# Altium PCB Karta_TETRA.PCBDOC (part 2 of 8)
Units mm, origin at the board's own origin, x right, y up, seen from the top; angles counter-clockwise.
Board outline 70 x 83.2 mm, 6 copper layers (TopLayer, Layer 1, Layer 2, Layer 3, Layer 4, Bottom Layer), stack 0.914 mm thick; 344 components, 222 nets, 1133 pads, 615 vias.
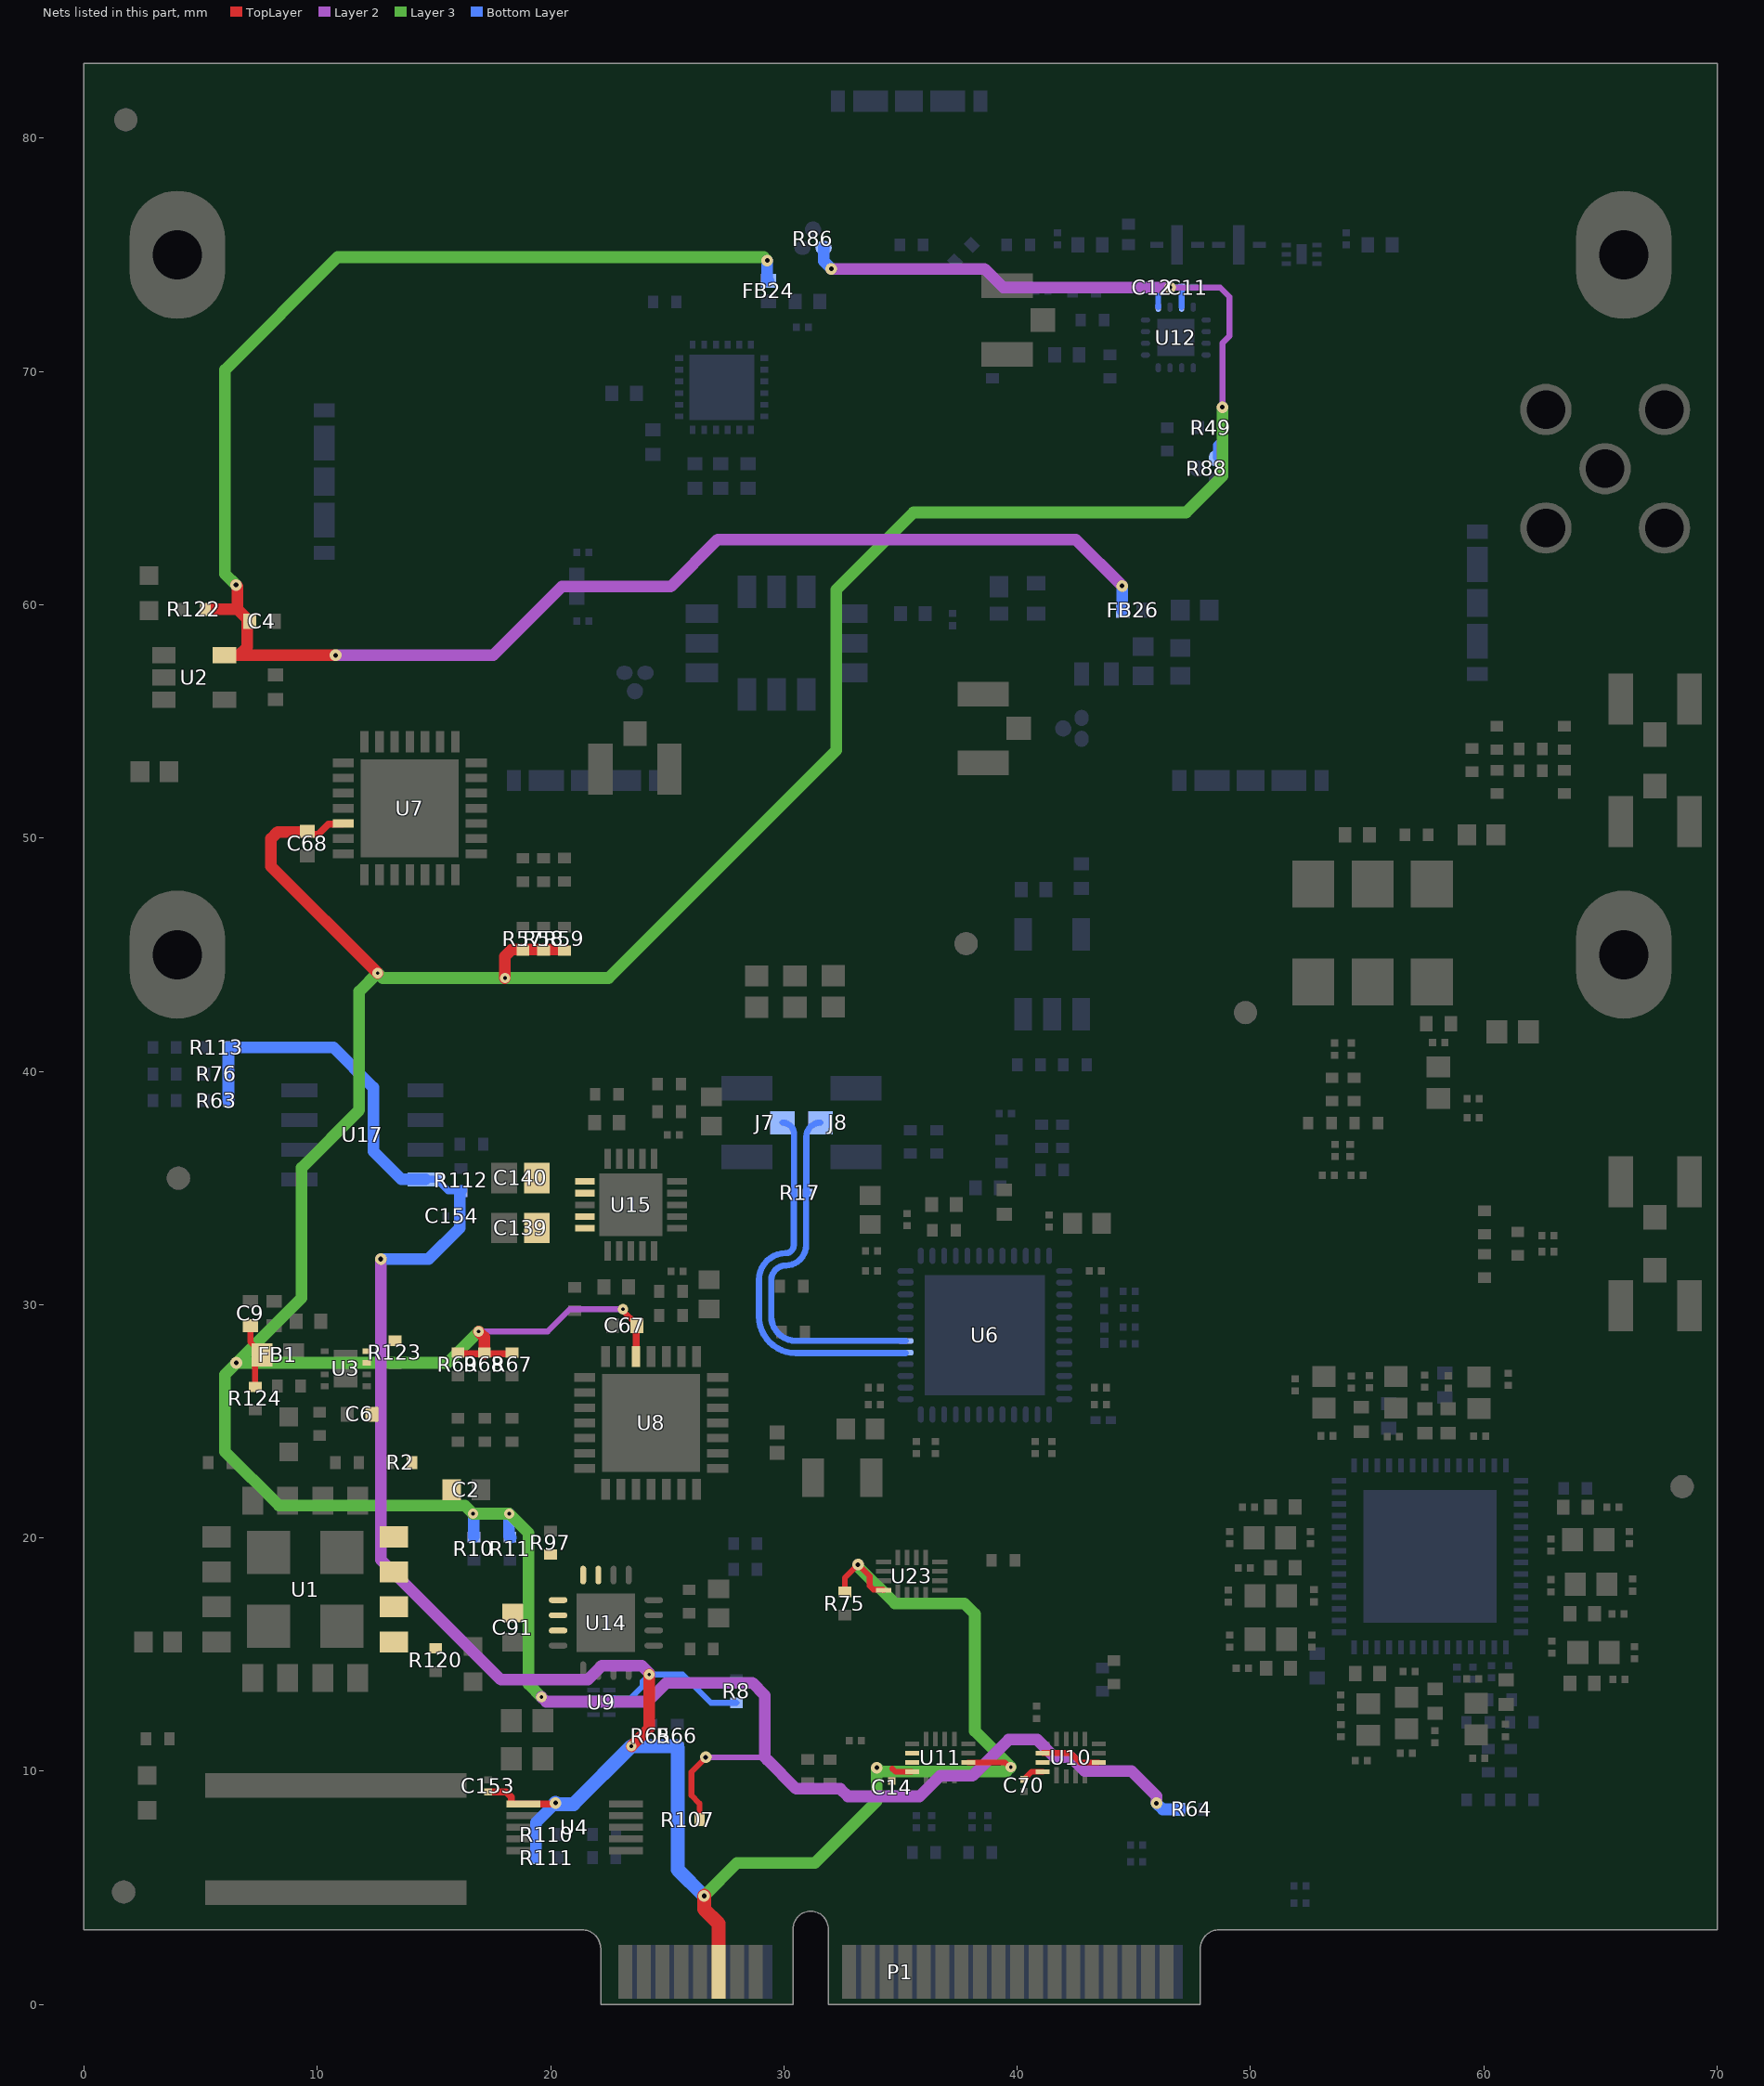
[diagram p6: the nets of this part, all layers, seen from the top]

## Footprints (in the part's own frame and the unit in brackets; to place one, negate y for a bottom-side part, rotate by r counter-clockwise, add the part's x,y. Pads: shape width x height; smd on the part's side, far side on the other; paste and mask are expansions set on the pad) (continued)
"RES 0201/0603"#2 [mm] "Chip Resistor, 2-Leads, Body 0.60x0.30mm, IPC Medium Density"
  rect 0.44x0.35 smd: 1(-0.325,0) 2(0.394,0)
  silkscreen extent -0.7,-0.33 0.7,0.33, body extent -0.3,-0.15 0.3,0.15, height 0.21
"RES 0201/0603"#3 [mm] "Chip Resistor, 2-Leads, Body 0.60x0.30mm, IPC Medium Density"
  rect 0.44x0.35 smd mask+0.055: 1(-0.325,0) 2(0.325,0)
  silkscreen extent -0.7,-0.33 0.7,0.33, body extent -0.3,-0.15 0.3,0.15, height 0.21
"RES 0402/1005 RF - 3-PADS" [mm] "Chip Resistor, 2-Leads, Body 1.0x0.5mm, IPC High Density"
  oval 0.7x0.6 smd: 1(-0.45,0) 2(0.45,0)
  round 0.7 smd paste-2: 3(0,0.787)
  silkscreen extent -1.02,-0.5 1.02,1.34, body extent -0.5,-0.25 0.5,0.25, height 0.35
"RES 0402/1005 RF KK" [mm] "Chip Resistor, 2-Leads, Body 1.0x0.5mm, IPC High Density"
  rect 0.45x0.55 smd: 1(-0.5,0) 2(0.5,0)
  silkscreen extent -1.02,-0.51 1.02,0.51, body extent -0.5,-0.25 0.5,0.25, height 0.35
"RES 0603/1608 RF" [mm]
  rect 0.75x0.85 smd: 1(-0.6,0) 2(0.6,0)
  silkscreen extent -1.2,-0.6 1.2,0.6, body extent -0.8,-0.4 0.8,0.4, height 0.45
ROS-32K101-400L5_V [mm] "SMA Straight Jack, 6.35x6.35x9.5mm, Rosenberger Recommended"
  round 2.2 hole 1.65: 1(0,0) MH(-2.54,2.54) MH(-2.54,-2.54) MH(2.54,2.54) MH(2.54,-2.54)
  silkscreen extent -3.17,-3.18 3.18,3.17, body extent -3.17,-3.17 3.18,3.18, height 9.5
Tai-Saw_7x5p12 [mm] "TA0409A, 12-Pins, Body 5,00x7,00mmx1,70mm, Pitch 1,27mm, IPC Medium Density"
  rect 1.4x0.8 smd: 1(-2.2,1.27) 2(-2.2,0) 3(-2.2,-1.27) 7(2.2,-1.27) 8(2.2,0) 9(2.2,1.27)
  rect 0.8x1.4 smd: 4(-1.27,-3.2) 5(0,-3.2) 6(1.27,-3.2) 10(1.27,3.2) 11(0,3.2) 12(-1.27,3.2)
  silkscreen extent -3.57,-3.6 2.6,3.6, body extent -2.5,-3.5 2.5,3.5, height 1.7
TECO-1909763-1_V [mm] "SMD, 3-Leads, Body 2.6x2.6mm, Height 1.25mm"
  rect 1.05x2.2 smd: 1(-1.475,0) 3(1.475,0)
  rect 1x1.05 smd: 2(0,-1.525)
  silkscreen extent -1.9,-1.77 0.55,1.3, body extent -1.5,-1.55 1.5,1.55, height 1.25
TPS7A88 [mm] "RTJ (S-PWQFN-N20) 20-Leads, Body 4,00x4,00mm, Pitch 0,50mm, Thermal Pad 2,70x2,70mm, IPC High Density"
  rect 0.85x0.28 smd: 1(-1.975,1) 2(-1.975,0.5) 3(-1.975,0) 4(-1.975,-0.5) 5(-1.975,-1) 11(1.975,-1) 12(1.975,-0.5) 13(1.975,0) 14(1.975,0.5) 15(1.975,1)
  rect 0.28x0.85 smd: 6(-1,-1.975) 7(-0.5,-1.975) 8(0,-1.975) 9(0.5,-1.975) 10(1,-1.975) 16(1,1.975) 17(0.5,1.975) 18(0,1.975) 19(-0.5,1.975) 20(-1,1.975)
  rect 2.7x2.7 smd paste-3 mask+0.102: 21(0,0)
  silkscreen extent -2.85,-2.07 2.07,2.07, body extent -2.07,-2.07 2.07,2.07, height 0.8
TXB0304 [mm] "RSV0016A UQFN - 0.55 mm max height"
  rect 0.75x0.2 smd: 1(-0.75,0.6)
  rect 0.65x0.2 smd: 2(-0.8,0.2) 3(-0.8,-0.2) 4(-0.8,-0.6) 9(0.8,-0.6) 10(0.8,-0.2) 11(0.8,0.2) 12(0.8,0.6)
  rect 0.2x0.65 smd: 5(-0.6,-1.2) 6(-0.2,-1.2) 7(0.2,-1.2) 8(0.6,-1.2) 13(0.6,1.2) 14(0.2,1.2) 15(-0.2,1.2) 16(-0.6,1.2)
  silkscreen extent -1.27,1.58 -1.18,1.67, body extent -0.92,-1.33 0.92,1.33, height 0.55
VG-4513CA [mm] "VG-4513CA, Concave, 6-Leads, Pitch 2,54mm,  Body 7,00x5,00mm,  IPC Medium Density"
  rect 2x1.8 smd: 1(-2.1,2.54) 2(-2.1,0) 3(-2.1,-2.54) 4(2.1,-2.54) 5(2.1,0) 6(2.1,2.54)
  silkscreen extent -3.26,3.28 -3.16,3.38, body extent -2.55,-3.5 2.55,3.5, height 1.6
WE-KI_0603 [mm] "SMD Wire Wound Ceramic Inductor, body 1.6x1.05mm"
  rect 0.625x1 smd: 1(-0.637,0) 2(0.637,0)
  body extent -0.82,-0.58 0.83,0.58, height 0.92

## Part data
C1 C2 C38 C75 C76 C91: library part Capacitor, "TAIYO YUDEN - EMK107ABJ475MA-T - SMD Multilayer Ceramic Capacitor, 4.7 µF, 16 V, 0603 [1608 Metric], ± 20%, X5R, M Series", Case/Package=Ceramic, Dielectric=X5R, Manufacturer="Taiyo Yuden", Manufacturer Part Number=EMK107ABJ475MA-T, Max Operating Temperature=85°C, Min Operating Temperature=-55°C, Supplier Part Number 1=587-6003-1-ND, Tolerance=20%, Voltage=16V, Capacitance=4.7uF, Category="Ceramic Capacitors", ComponentLink1Description=https://datasheet.ciiva.com/26871/getdatasheetpartid-637315-26871304.pdf?src-supplier=Verical, ComponentLink1URL=https://datasheet.ciiva.com/26871/getdatasheetpartid-637315-26871304.pdf?src-supplier=Verical, Depth=0.8mm, Height=0.8mm, Lead Free="Lead Free", Length=1.6mm, Mount="Surface Mount", Packaging="Tape and Reel", Pricing 1="1=0,28000, 10=0,19200, 50=0,12820, 100=0,10900, 500=0,07696, 1000=0,06734 (USD)", Radiation Hardening=No, RoHS=Yes, Stock 1=5, Supplier 1=Digi-Key
C3: library part Capacitor, Case Code (Imperial)=0603, Case Code (Metric)=1608, Dielectric=X5R, Manufacturer 1=Samsung, Manufacturer Part Number 1=CL10A105KA8NNNC, Max Operating Temperature=85°C, Min Operating Temperature=-55°C, Package Quantity=1, Supplier Part Number 1=1276-1102-1-ND, Tolerance=10%, Voltage=25V, Capacitance=1uF, Case/Package=0603, ComponentLink1Description=https://datasheet.ciiva.com/25801/cl10a105ka8nnnc-25801364.pdf?src-supplier=Digi-Key, ComponentLink1URL=https://datasheet.ciiva.com/25801/cl10a105ka8nnnc-25801364.pdf?src-supplier=Digi-Key, ComponentLink2Description=https://datasheet.ciiva.com/26838/getdatasheetpartid-357530-26838332.pdf?src-supplier=Verical, ComponentLink2URL=https://datasheet.ciiva.com/26838/getdatasheetpartid-357530-26838332.pdf?src-supplier=Verical, ComponentLink3Description=https://datasheet.ciiva.com/29198/458162-da-01-en-vs-kondensator-0603-29198475.pdf?src-supplier=Conrad, ComponentLink3URL=https://datasheet.ciiva.com/29198/458162-da-01-en-vs-kondensator-0603-29198475.pdf?src-supplier=Conrad, Contact Plating=Tin, Depth=0.8mm, Height=0.8mm, Lead Free="Lead Free", Length=1.6mm, Material=Ceramic, Mount="Surface Mount", Packaging="Tape and Reel", Pricing 1="1=0.10000, 10=0.04100, 100=0.01850, 500=0.01320, 1000=0.01037 (USD)", Radiation Hardening=No, RoHS=Yes, Stock 1=3421596, Supplier 1=Digi-Key, Thickness=0.035inch, Voltage Rating=25V, Voltage Rating (DC)=25V, Width=0.031inch
C4 C65 C73 C74: library part Capacitor, "MURATA - GRM155R61A225KE95D - Keramikvielschichtkondensator, SMD, 2.2 µF, 10 V, 0402 [Metrisch 1005], ± 10%, X5R, Baureihe GRM", Case Code (Imperial)=0402, Case Code (Metric)=1005, Dielectric=X5R, Manufacturer=Murata, Manufacturer Part Number=GRM155R61A225KE95D, Max Operating Temperature=85°C, Min Operating Temperature=-55°C, Package Quantity=10000, Supplier Part Number 1=490-10451-1-ND, Tolerance=10%, Voltage Rating=10V, Capacitance=2.2uF, Case/Package=0402, Category="Ceramic Capacitors", ComponentLink1Description=http://www.mouser.com/ds/2/281/c02e-2905.pdf?src-supplier=Mouser, ComponentLink1URL=http://www.mouser.com/ds/2/281/c02e-2905.pdf?src-supplier=Mouser, ComponentLink2Description=http://components.arrow.com/part/dataview/0323_04264073?src-supplier=Arrow+Europe, ComponentLink2URL=http://components.arrow.com/part/dataview/0323_04264073?src-supplier=Arrow+Europe, ComponentLink3Description=http://www.farnell.com/datasheets/1872202.pdf?src-supplier=Farnell, ComponentLink3URL=http://www.farnell.com/datasheets/1872202.pdf?src-supplier=Farnell, ComponentLink4Description=http://www.farnell.com/datasheets/2047915.pdf?src-supplier=Farnell, ComponentLink4URL=http://www.farnell.com/datasheets/2047915.pdf?src-supplier=Farnell, ComponentLink5Description=http://www.farnell.com/datasheets/1872202.pdf?src-supplier=Element14, ComponentLink5URL=http://www.farnell.com/datasheets/1872202.pdf?src-supplier=Element14, ComponentLink6Description=http://www.farnell.com/datasheets/1872202.pdf?src-supplier=Newark, ComponentLink6URL=http://www.farnell.com/datasheets/1872202.pdf?src-supplier=Newark, ComponentLink7Description=http://psearch.en.murata.com/capacitor/product/GRM155R61A225KE95%23.pdf?src-supplier=Avnet, ComponentLink7URL=http://psearch.en.murata.com/capacitor/product/GRM155R61A225KE95%23.pdf?src-supplier=Avnet, ComponentLink8Description=http://www.farnell.com/datasheets/2047915.pdf?src-supplier=Element14, ComponentLink8URL=http://www.farnell.com/datasheets/2047915.pdf?src-supplier=Element14, ComponentLink9Description=https://search.murata.co.jp/Ceramy/image/img/A01X/G101/ENG/GRM155R61A225KE95-01.pdf?src-supplier=Digi-Key, ComponentLink9URL=https://search.murata.co.jp/Ceramy/image/img/A01X/G101/ENG/GRM155R61A225KE95-01.pdf?src-supplier=Digi-Key, ComponentLink10Description=http://www.farnell.com/datasheets/2047915.pdf?src-supplier=Newark, ComponentLink10URL=http://www.farnell.com/datasheets/2047915.pdf?src-supplier=Newark, Depth=0.5mm, Height=0.5mm, Lead Free="Lead Free", Length=1mm, Material=Ceramic, Mount="Surface Mount", Packaging="Tape and Reel", REACH SVHC="No SVHC", RoHS=Yes, Supplier 1=Digi-Key, Termination=SMD/SMT, Thickness=0.022inch, Voltage Rating (DC)=10V, Weight=0.000212oz, Width=0.5mm
  C4: Pricing 1="1=0,11000, 10=0,07700, 50=0,04380, 100=0,03630, 500=0,02546, 1000=0,02108, 2500=0,01962, 5000=0,01795 (USD)", Stock 1=502318
  C65 C73 C74: Pricing 1="1=0,11000, 10=0,08100, 100=0,03800, 500=0,02664, 1000=0,02205, 2500=0,02052, 5000=0,01878 (USD)", Stock 1=2215146
C5 C42: library part Capacitor, Case Code (Imperial)=0402, Case Code (Metric)=1005, Dielectric=C0G, Dielectric Material=Ceramic, Manufacturer 1=KEMET, Manufacturer Part Number 1=C0402C101J5GACAUTO, Max Operating Temperature=125°C, Min Operating Temperature=-55°C, Package Quantity=10000, Ratings=AEC-Q200, Supplier Part Number 1=399-6823-1-ND, Tolerance=5%, Voltage Rating=50V, Capacitance=100pF, Case/Package=0402, ComponentLink1Description=https://datasheet.ciiva.com/26923/getdatasheetpartid-385375-26923866.pdf?src-supplier=Verical, ComponentLink1URL=https://datasheet.ciiva.com/26923/getdatasheetpartid-385375-26923866.pdf?src-supplier=Verical, Depth=0.5mm, Lead Free="Lead Free", Length=1mm, Mount="Surface Mount", Packaging="Tape and Reel", Pricing 1="1=0.11000, 10=0.08400, 100=0.03730, 500=0.02664, 1000=0.02093, 2500=0.01903, 5000=0.01751 (USD)", Radiation Hardening=No, REACH SVHC="No SVHC", RoHS=Yes, Stock 1=66452, Supplier 1=Digi-Key, Thickness=0.022inch, Voltage Rating (DC)=50V, Width=0.02inch
C6 C7 C67 C68: library part Capacitor, "MURATA - GRT155R61E105KE01D - SMD Multilayer Ceramic Capacitor, 1 µF, 25 V, 0402 [1005 Metric], ± 10%, X5R, GRT Series - SMD Multilayer Ceramic Capacitor, 1 µF, 25 V, 0402 [1005 Metric], ± 10%, X5R, GRT Series", Case Code (Imperial)=0402, Case Code (Metric)=1005, Dielectric=X5R, Manufacturer=Murata, Manufacturer Part Number=GRT155R61E105KE01D, Max Operating Temperature=85°C, Min Operating Temperature=-55°C, Ratings=AEC-Q200, Supplier Part Number 1=490-12263-1-ND, Tolerance=10%, Voltage Rating=25V, Capacitance=1uF, Case/Package=0402, Category="Ceramic Capacitors", ComponentLink1Description=http://www.farnell.com/datasheets/2165918.pdf?src-supplier=Farnell, ComponentLink1URL=http://www.farnell.com/datasheets/2165918.pdf?src-supplier=Farnell, ComponentLink2Description=http://search.murata.co.jp/Ceramy/image/img/A01X/G101/ENG/GRT155R61E105KE01-01.pdf?src-supplier=Digi-Key, ComponentLink2URL=http://search.murata.co.jp/Ceramy/image/img/A01X/G101/ENG/GRT155R61E105KE01-01.pdf?src-supplier=Digi-Key, ComponentLink3Description=http://www.farnell.com/datasheets/2165918.pdf?src-supplier=Element14, ComponentLink3URL=http://www.farnell.com/datasheets/2165918.pdf?src-supplier=Element14, Length=0.039inch, Mount="Surface Mount", Packaging="Tape and Reel", Pricing 1="1=0,18000, 10=0,12300, 100=0,06210, 500=0,04248, 1000=0,03758, 2500=0,03594, 5000=0,03268 (USD)", RoHS=Yes, Stock 1=341453, Supplier 1=Digi-Key, Thickness=0.022inch, Voltage Rating (DC)=25V, Width=0.02inch
C8 C9: library part Capacitor, Case Code (Imperial)=0402, Case Code (Metric)=1005, Manufacturer 1=Murata, Manufacturer Part Number 1=GRM155R61A475MEAAD, Max Operating Temperature=85°C, Min Operating Temperature=-55°C, Supplier Part Number 1=490-14306-1-ND, Tolerance=20%, Voltage Rating=10V, Capacitance=4.7uF, Case/Package=0402, ComponentLink1Description=http://www.farnell.com/datasheets/2189109.pdf?src-supplier=Farnell, ComponentLink1URL=http://www.farnell.com/datasheets/2189109.pdf?src-supplier=Farnell, ComponentLink2Description=https://search.murata.co.jp/Ceramy/image/img/A01X/G101/ENG/GRM155R61A475MEAA-01.pdf?src-supplier=Digi-Key, ComponentLink2URL=https://search.murata.co.jp/Ceramy/image/img/A01X/G101/ENG/GRM155R61A475MEAA-01.pdf?src-supplier=Digi-Key, ComponentLink3Description=http://datasheet.octopart.com/GRM155R61A475MEAAD-Murata-datasheet-68589269.pdf?src-supplier=Newark, ComponentLink3URL=http://datasheet.octopart.com/GRM155R61A475MEAAD-Murata-datasheet-68589269.pdf?src-supplier=Newark, ComponentLink4Description=http://datasheet.octopart.com/GRM155R61A475MEAAD-Murata-datasheet-8819587.pdf, ComponentLink4URL=http://datasheet.octopart.com/GRM155R61A475MEAAD-Murata-datasheet-8819587.pdf, ComponentLink5Description=http://datasheet.octopart.com/GRM155R61A475MEAAD-Murata-datasheet-10025737.pdf, ComponentLink5URL=http://datasheet.octopart.com/GRM155R61A475MEAAD-Murata-datasheet-10025737.pdf, ComponentLink6Description=http://datasheet.octopart.com/GRM155R61A475MEAAD-Murata-datasheet-11978611.pdf, ComponentLink6URL=http://datasheet.octopart.com/GRM155R61A475MEAAD-Murata-datasheet-11978611.pdf, ComponentLink7Description=http://datasheet.octopart.com/GRM155R61A475MEAAD-Murata-datasheet-12510076.pdf, ComponentLink7URL=http://datasheet.octopart.com/GRM155R61A475MEAAD-Murata-datasheet-12510076.pdf, ComponentLink8Description=http://datasheet.octopart.com/GRM155R61A475MEAAD-Murata-datasheet-12515295.pdf, ComponentLink8URL=http://datasheet.octopart.com/GRM155R61A475MEAAD-Murata-datasheet-12515295.pdf, Mount="Surface Mount", Packaging="Tape and Reel", Pricing 1="1=0.23000, 10=0.15400, 100=0.07780, 500=0.05322, 1000=0.04708, 2500=0.04504, 5000=0.04094 (USD)", Stock 1=1535315, Supplier 1=Digi-Key
C10 C158 C159 C160 C163 C164 C167 C169: library part Capacitor, "CAP CER 120PF 25V C0G/NP0 0402", Case Code (Imperial)=0402, Case Code (Metric)=1005, Manufacturer=KEMET, Manufacturer Part Number=C0402C121J3GAC7867, Max Operating Temperature=125°C, Min Operating Temperature=-55°C, Supplier Part Number 1=399-14880-1-ND, Tolerance=5%, Voltage Rating=25V, Capacitance=120pF, Case/Package=0402, Category="Ceramic Capacitors", ComponentLink1Description=https://api.kemet.com/component-edge/download/datasheet/C0402C121J3GAC7867.pdf?src-supplier=Digi-Key, ComponentLink1URL=https://api.kemet.com/component-edge/download/datasheet/C0402C121J3GAC7867.pdf?src-supplier=Digi-Key, Mount="Surface Mount", Packaging="Tape and Reel", Pricing 1="1=0,10000, 10=0,04100, 50=0,02260, 100=0,01840, 500=0,01312, 1000=0,01032, 2500=0,00938, 5000=0,00863 (USD)", RoHS=No, Stock 1=43311, Supplier 1=Digi-Key
C11 C48 C49 C168 C186 C187: library part Capacitor, "Multilayer Ceramic Capacitors MLCC - SMD/SMT 0201 100pF 25volts C0G +/-5%", Case Code (Imperial)=0201, Case Code (Metric)=0603, Dielectric=C0G, Manufacturer=Murata, Manufacturer Part Number=GRM0335C1E101JA01D, Max Operating Temperature=125°C, Min Operating Temperature=-55°C, Package Quantity=15000, Supplier Part Number 1=490-3160-1-ND, Tolerance=5%, Voltage=25V, Capacitance=100pF, Case/Package=0201, Category="Ceramic Capacitors", ComponentLink1Description=https://datasheet.ciiva.com/16497/grm0335c1e101ja01-01-16497112.pdf?src-supplier=Future+Electronics, ComponentLink1URL=https://datasheet.ciiva.com/16497/grm0335c1e101ja01-01-16497112.pdf?src-supplier=Future+Electronics, ComponentLink2Description=https://datasheet.ciiva.com/18697/product-18697797.pdf?src-supplier=Digi-Key, ComponentLink2URL=https://datasheet.ciiva.com/18697/product-18697797.pdf?src-supplier=Digi-Key, Depth=0.3mm, Height=0.3mm, Lead Free="Lead Free", Length=0.6mm, Mount="Surface Mount", Packaging="Tape and Reel", Radiation Hardening=No, REACH SVHC="No SVHC", RoHS=Yes, Supplier 1=Digi-Key, Termination=SMD/SMT, Thickness=0.013inch, Voltage Rating=25V, Voltage Rating (DC)=25V, Width=0.012inch
  C11 C186 C187: Pricing 1="1=0,10000, 10=0,01300, 100=0,00560, 500=0,00400, 1000=0,00315, 2500=0,00286, 5000=0,00263 (USD)", Stock 1=270262
  C48 C49 C168: Pricing 1="1=0,10000, 10=0,01200, 50=0,00660, 100=0,00530, 500=0,00382, 1000=0,00299, 2500=0,00272, 5000=0,00250 (USD)", Stock 1=2569728
C12 C13 C14 C15 C40 C41 C43 C44 C46 C47 C50 C51 C52 C53 C54 C55 C56 C57 C58 C59 C66 C70 C71 C77 C78 C79 C80 C81 C82 C83 C84 C85 C88 C89 C90 C93 C94 C95 C97 C98 C99 C101 C102 C103 C105 C106 C107 C109 C110 C111 C113 C114 C115 C117 C118 C119 C121 C122 C123 C125 C126 C127 C131 C132 C133 C135 C136 C137 C143 C144 C145 C147 C148 C149 C153 C154 C179 C180 C192 C193: library part Capacitor, Case Code (Imperial)=0201, Case Code (Metric)=0603, Dielectric=X5R, Manufacturer 1=Murata, Manufacturer Part Number 1=GRM033R61C104ME84D, Max Operating Temperature=85°C, Min Operating Temperature=-55°C, Package Quantity=15000, Supplier Part Number 1=490-9986-1-ND, Tolerance=20%, Voltage Rating=16V, Capacitance=100nF, Case/Package=0201, ComponentLink1Description=http://www.mouser.com/ds/2/281/c02e-2905.pdf?src-supplier=Mouser, ComponentLink1URL=http://www.mouser.com/ds/2/281/c02e-2905.pdf?src-supplier=Mouser, ComponentLink2Description=http://search.murata.co.jp/Ceramy/image/img/A01X/G101/ENG/GRM033R61C104ME84-01.pdf?src-supplier=Digi-Key, ComponentLink2URL=http://search.murata.co.jp/Ceramy/image/img/A01X/G101/ENG/GRM033R61C104ME84-01.pdf?src-supplier=Digi-Key, Height=0.3mm, Length=0.024inch, Mount="Surface Mount", Packaging="Tape and Reel", Pricing 1="1=0.10000, 10=0.05400, 100=0.02430, 500=0.01732, 1000=0.01361, 2500=0.01238, 5000=0.01139 (USD)", RoHS=Yes, Supplier 1=Digi-Key, Termination=SMD/SMT, Thickness=0.013inch, Voltage Rating (DC)=16V, Weight=1.2E-05oz, Width=0.3mm
  C12 C13 C14 C15 C40 C41 C43 C44 C46 C47 C50 C51 C52 C53 C54 C55 C56 C57 C58 C59 C66 C70 C71 C77 C78 C79 C80 C81 C82 C83 C84 C85 C88 C89 C90 C93 C94 C95 C97 C98 C99 C101 C102 C103 C105 C106 C107 C109 C110 C111 C113 C114 C115 C117 C118 C119 C121 C122 C123 C125 C126 C127 C131 C132 C133 C135 C136 C137 C143 C144 C145 C147 C148 C149 C153 C154 C179 C192 C193: Stock 1=503570
  C180: Stock 1=550070
C35 C36 C37 C96 C100 C104 C108 C112 C116 C120 C124 C128 C134 C138 C146 C150 C181: library part Capacitor, "CAP CER 10UF 6.3V X5R 0402", Case Code (Imperial)=0402, Case Code (Metric)=1005, Manufacturer=Murata, Manufacturer Part Number=GRJ155R60J106ME11D, Max Operating Temperature=85°C, Min Operating Temperature=-55°C, Supplier Part Number 1=490-13211-1-ND, Tolerance=20%, Voltage Rating=6.3V, Capacitance=10uF, Case/Package=0402, Category="Ceramic Capacitors", ComponentLink1Description=http://psearch.en.murata.com/capacitor/product/GRJ155R60J106ME11%23.pdf?src-supplier=Digi-Key, ComponentLink1URL=http://psearch.en.murata.com/capacitor/product/GRJ155R60J106ME11%23.pdf?src-supplier=Digi-Key, Features="Soft Termination", Length=0.039inch, Mount="Surface Mount", Packaging="Cut Tape", Pricing 1="1=0,21000, 10=0,14500, 50=0,08680, 100=0,07330, 500=0,05016, 1000=0,04436, 2500=0,04244, 5000=0,03858 (USD)", RoHS=Yes, Stock 1=1136490, Supplier 1=Digi-Key, Thickness=0.028inch, Width=0.02inch
C39 C45: library part Capacitor, Case Code (Imperial)=0201, Case Code (Metric)=0603, Dielectric=X5R, Manufacturer 1=Yageo, Manufacturer Part Number 1=CC0201KRX5R6BB104, Max Operating Temperature=85°C, Min Operating Temperature=-55°C, Supplier Part Number 1=311-1593-1-ND, Tolerance=10%, Voltage Rating=10V, Capacitance=100nF, Case/Package=0201, ComponentLink1Description=https://datasheet.ciiva.com/17437/upy-gphc-x5r-4v-to-50v-12-17437495.pdf?src-supplier=Avnet+Europe, ComponentLink1URL=https://datasheet.ciiva.com/17437/upy-gphc-x5r-4v-to-50v-12-17437495.pdf?src-supplier=Avnet+Europe, ComponentLink2Description=https://datasheet.ciiva.com/11587/upy-gphc-x5r-4v-to-50v-12-11587190.pdf?src-supplier=Avnet, ComponentLink2URL=https://datasheet.ciiva.com/11587/upy-gphc-x5r-4v-to-50v-12-11587190.pdf?src-supplier=Avnet, Composition=Ceramic, Depth=0.3mm, Halogen Free="Halogen Free", Height=0.3mm, Lead Free="Lead Free", Length=0.6mm, Mount="Surface Mount", Packaging="Tape and Reel", Pricing 1="1=0.10000, 10=0.03800, 100=0.01690, 500=0.01208, 1000=0.00949, 2500=0.00862, 5000=0.00794 (USD)", Radiation Hardening=No, RoHS=Yes, Stock 1=1229391, Supplier 1=Digi-Key, Termination=SMD/SMT, Thickness=0.013inch, Voltage Rating (DC)=10V, Weight=6E-06oz, Width=0.012inch
C60 C61 C63 C64 C92: library part Capacitor, "Cap Ceramic 0.001uF 25V X7R 10% SMD 0201 125°C Paper T/R", Case Code (Imperial)=0201, Case Code (Metric)=0603, Dielectric=X7R, Manufacturer=Murata, Manufacturer Part Number=GRM033R71E102KA01J, Max Operating Temperature=125°C, Min Operating Temperature=-55°C, Package Quantity=50000, Supplier Part Number 1=490-8161-1-ND, Tolerance=10%, Voltage Rating=25V, Capacitance=1nF, Case/Package=0201, Category="Ceramic Capacitors", ComponentLink1Description=https://datasheet.ciiva.com/5453/product-5453157.pdf?src-supplier=Mouser, ComponentLink1URL=https://datasheet.ciiva.com/5453/product-5453157.pdf?src-supplier=Mouser, ComponentLink2Description=https://datasheet.ciiva.com/11621/product-11621675.pdf?src-supplier=Avnet, ComponentLink2URL=https://datasheet.ciiva.com/11621/product-11621675.pdf?src-supplier=Avnet, Depth=0.3mm, Height=0.3mm, Length=0.6mm, Mount="Surface Mount", Packaging="Tape and Reel", Pricing 1="1=0,10000, 10=0,02900, 100=0,01300, 500=0,00932, 1000=0,00732, 2500=0,00666, 5000=0,00612 (USD)", Radiation Hardening=No, RoHS=Yes, Stock 1=140332, Supplier 1=Digi-Key, Termination=SMD/SMT, Thickness=0.013inch, Voltage Rating (DC)=25V, Width=0.012inch
C86 C87 C129 C141: library part Capacitor, "0603 10 uF 16 V ±10% Tolerance X5R Multilayer Ceramic Capacitor", Case Code (Imperial)=0603, Case Code (Metric)=1608, Dielectric=X5R, Manufacturer=Murata, Manufacturer Part Number=GRM188R61C106KAALJ, Max Operating Temperature=85°C, Min Operating Temperature=-55°C, Package Quantity=10000, Supplier Part Number 1=490-12736-1-ND, Tolerance=10%, Voltage Rating=16V, Capacitance=10uF, Case/Package=0603, Category="Ceramic Capacitors", ComponentLink1Description=http://www.mouser.com/ds/2/281/GRM188R61C106KAAL-01-1064790.pdf?src-supplier=Mouser, ComponentLink1URL=http://www.mouser.com/ds/2/281/GRM188R61C106KAAL-01-1064790.pdf?src-supplier=Mouser, ComponentLink2Description=http://search.murata.co.jp/Ceramy/image/img/A01X/G101/ENG/GRM188R61C106KAAL-01.pdf?src-supplier=Digi-Key, ComponentLink2URL=http://search.murata.co.jp/Ceramy/image/img/A01X/G101/ENG/GRM188R61C106KAAL-01.pdf?src-supplier=Digi-Key, Composition=Ceramic, Height=0.8mm, Length=0.063inch, Mount="Surface Mount", Packaging="Tape and Reel", Pricing 1="1=0,43000, 10=0,29900, 100=0,17910, 500=0,13434, 1000=0,11345, 2500=0,10748, 5000=0,10150 (USD)", RoHS=Yes, Stock 1=68393, Supplier 1=Digi-Key, Termination=SMD/SMT, Thickness=0.037inch, Voltage Rating (DC)=16V, Weight=0.000222oz, Width=0.031inch
C130 C142: library part Capacitor, "Multilayer Ceramic Capacitors MLCC - SMD/SMT 0.01uF 10 volts 10%", Case Code (Imperial)=0201, Case Code (Metric)=0603, Dielectric=X5R, Manufacturer=Murata, Manufacturer Part Number=GRM033R61A103KA01J, Max Operating Temperature=85°C, Min Operating Temperature=-55°C, Package Quantity=50000, Supplier Part Number 1=490-8156-1-ND, Tolerance=10%, Voltage Rating=10V, Capacitance=10nF, Case/Package=0201, Category="Ceramic Capacitors", ComponentLink1Description=https://datasheet.ciiva.com/29542/grm033r61a103ka01-01-29542528.pdf?src-supplier=Digi-Key, ComponentLink1URL=https://datasheet.ciiva.com/29542/grm033r61a103ka01-01-29542528.pdf?src-supplier=Digi-Key, ComponentLink2Description=https://datasheet.ciiva.com/11620/product-11620086.pdf?src-supplier=Avnet, ComponentLink2URL=https://datasheet.ciiva.com/11620/product-11620086.pdf?src-supplier=Avnet, ComponentLink3Description=https://datasheet.ciiva.com/29542/grm033r61a103ka01-01-29542527.pdf?src-supplier=Digi-Key, ComponentLink3URL=https://datasheet.ciiva.com/29542/grm033r61a103ka01-01-29542527.pdf?src-supplier=Digi-Key, ComponentLink4Description=https://datasheet.ciiva.com/29542/grm033r61a103ka01-01-29542526.pdf?src-supplier=Digi-Key, ComponentLink4URL=https://datasheet.ciiva.com/29542/grm033r61a103ka01-01-29542526.pdf?src-supplier=Digi-Key, Depth=0.3mm, Height=0.3mm, Lead Free="Lead Free", Length=0.6mm, Mount="Surface Mount", Packaging="Tape and Reel", Pricing 1="1=0,10000, 10=0,02900, 100=0,01300, 500=0,00932, 1000=0,00732, 2500=0,00666, 5000=0,00612 (USD)", Radiation Hardening=No, RoHS=Yes, Stock 1=128195, Supplier 1=Digi-Key, Termination=SMD/SMT, Thickness=0.013inch, Voltage Rating (DC)=10V, Width=0.012inch
C139 C140: library part Capacitor, "CAP CER 10UF 25V X5R 0805", Case Code (Imperial)=0805, Case Code (Metric)=2012, Dielectric=X5R, Dielectric Material=Ceramic, Manufacturer=KEMET, Manufacturer Part Number=C0805C106K3PACTU, Max Operating Temperature=85°C, Min Operating Temperature=-55°C, Supplier Part Number 1=399-11939-6-ND, Tolerance=10%, Voltage=25V, Capacitance=10uF, Case/Package=0805, Category="Ceramic Capacitors", ComponentLink1Description=http://www.farnell.com/datasheets/2741185.pdf?src-supplier=Farnell, ComponentLink1URL=http://www.farnell.com/datasheets/2741185.pdf?src-supplier=Farnell, ComponentLink2Description=http://www.farnell.com/datasheets/2112054.pdf?src-supplier=Farnell, ComponentLink2URL=http://www.farnell.com/datasheets/2112054.pdf?src-supplier=Farnell, ComponentLink3Description=http://www.alliedelec.com/m/d/f3c02ddb98afa3dd1adcb801109671e9.pdf?src-supplier=Allied+Electronics, ComponentLink3URL=http://www.alliedelec.com/m/d/f3c02ddb98afa3dd1adcb801109671e9.pdf?src-supplier=Allied+Electronics, ComponentLink4Description=http://www.farnell.com/datasheets/2112054.pdf?src-supplier=Element14, ComponentLink4URL=http://www.farnell.com/datasheets/2112054.pdf?src-supplier=Element14, ComponentLink5Description=https://api.kemet.com/component-edge/download/datasheet/C0805C106K3PAC7800.pdf?src-supplier=Digi-Key, ComponentLink5URL=https://api.kemet.com/component-edge/download/datasheet/C0805C106K3PAC7800.pdf?src-supplier=Digi-Key, ComponentLink6Description=http://www.kemet.com/docfinder?Partnumber=C0805C106K3PAC7800&src-supplier=Digi-Key, ComponentLink6URL=http://www.kemet.com/docfinder?Partnumber=C0805C106K3PAC7800&src-supplier=Digi-Key, ComponentLink7Description=http://www.kemet.com/Lists/ProductCatalog/Attachments/19/KEM_C1006_X5R_SMD.pdf?src-supplier=Avnet, ComponentLink7URL=http://www.kemet.com/Lists/ProductCatalog/Attachments/19/KEM_C1006_X5R_SMD.pdf?src-supplier=Avnet, Depth=1.25mm, Dissipation Factor=10%, Height=1.25mm, Lead Free="Lead Free", Length=0.079inch, Mount="Surface Mount", Packaging="Cut Tape", Pricing 1="1=0,24000, 10=0,16800, 100=0,09510, 500=0,06710, 1000=0,05872 (USD)", REACH SVHC="No SVHC", RoHS=Yes, Stock 1=4800, Supplier 1=Digi-Key, Termination=Solder, Thickness=0.057inch, Voltage Rating=25V, Voltage Rating (DC)=25V, Width=0.049inch
C151 C152: library part Capacitor, "CAP CER 0.1UF 50V X5R 0402", Case Code (Imperial)=0402, Case Code (Metric)=1005, Dielectric=X5R, Dielectric Material=Ceramic, Manufacturer=Murata, Manufacturer Part Number=GRM155R61H104KE14D, Max Operating Temperature=85°C, Min Operating Temperature=-55°C, Package Quantity=10000, Supplier Part Number 1=490-10697-1-ND, Tolerance=10%, Voltage=50V, Capacitance=100nF, Case/Package=0402, Category="Ceramic Capacitors", ComponentLink1Description=http://www.farnell.com/datasheets/2079150.pdf?src-supplier=Farnell, ComponentLink1URL=http://www.farnell.com/datasheets/2079150.pdf?src-supplier=Farnell, ComponentLink2Description=http://www.mouser.com/ds/2/281/c02e-2905.pdf?src-supplier=Mouser, ComponentLink2URL=http://www.mouser.com/ds/2/281/c02e-2905.pdf?src-supplier=Mouser, ComponentLink3Description=http://www.farnell.com/datasheets/2079150.pdf?src-supplier=Element14, ComponentLink3URL=http://www.farnell.com/datasheets/2079150.pdf?src-supplier=Element14, ComponentLink4Description=http://search.murata.co.jp/Ceramy/image/img/A01X/G101/ENG/GRM155R61H104KE14-01.pdf?src-supplier=Digi-Key, ComponentLink4URL=http://search.murata.co.jp/Ceramy/image/img/A01X/G101/ENG/GRM155R61H104KE14-01.pdf?src-supplier=Digi-Key, Composition=Ceramic, Depth=0.5mm, Dissipation Factor=0.025%, Height=0.5mm, Lead Free="Lead Free", Length=1mm, Mount="Surface Mount", Packaging="Tape and Reel", Pricing 1="1=0,10000, 10=0,04600, 100=0,02050, 500=0,01464, 1000=0,01150, 2500=0,01045, 5000=0,00961 (USD)", REACH SVHC="No SVHC", RoHS=Yes, Stock 1=435607, Supplier 1=Digi-Key, Termination=SMD/SMT, Thickness=0.022inch, Voltage Rating=50V, Voltage Rating (DC)=50V, Weight=0.000212oz, Width=0.02inch
C161 C162: library part Capacitor, "Multilayer Ceramic Capacitors MLCC - SMD/SMT 0603 8,200pF 50volts C0G +/-5%", Case Code (Imperial)=0603, Case Code (Metric)=1608, Dielectric=C0G, Manufacturer=Murata, Manufacturer Part Number=GRM1885C1H822JA01D, Max Operating Temperature=125°C, Min Operating Temperature=-55°C, Package Quantity=4000, Supplier Part Number 1=490-11482-1-ND, Tolerance=5%, Voltage Rating=50V, Capacitance=8.2nF, Case/Package=0603, Category="Ceramic Capacitors", ComponentLink1Description=https://datasheet.ciiva.com/29537/partnumbering-e-01-29537913.pdf?src-supplier=Digi-Key, ComponentLink1URL=https://datasheet.ciiva.com/29537/partnumbering-e-01-29537913.pdf?src-supplier=Digi-Key, Height=0.8mm, Length=0.063inch, Mount="Surface Mount", Packaging="Tape and Reel", Pricing 1="1=0,21000, 10=0,14200, 50=0,08500, 100=0,07170, 500=0,04908, 1000=0,04341 (USD)", RoHS=Yes, Stock 1=65615, Supplier 1=Digi-Key, Termination=SMD/SMT, Thickness=0.035inch, Voltage Rating (DC)=50V, Width=0.031inch
C182 C183 C184 C185: library part Capacitor, Case/Package=0402, Dielectric=C0G, Manufacturer 1="Walsin Technologies", Manufacturer Part Number 1=0402N331F500CT, Max Operating Temperature=125°C, Min Operating Temperature=-55°C, Supplier Part Number 1=1292-1307-1-ND, Tolerance=1%, Capacitance=330pF, ComponentLink1Description=http://components.arrow.com/part/dataview/0323_06535843?src-supplier=Arrow+Europe, ComponentLink1URL=http://components.arrow.com/part/dataview/0323_06535843?src-supplier=Arrow+Europe, ComponentLink2Description=http://www.passivecomponent.com/indexsea/0402N331F500CT-IN.pdf?src-supplier=Digi-Key, ComponentLink2URL=http://www.passivecomponent.com/indexsea/0402N331F500CT-IN.pdf?src-supplier=Digi-Key, Depth=0.5mm, Length=1mm, Packaging="Tape and Reel", Pricing 1="1=0.12000, 10=0.09000, 100=0.04030, 500=0.02876, 1000=0.02260, 2500=0.02054, 5000=0.01890 (USD)", RoHS=Yes, Stock 1=23341, Supplier 1=Digi-Key
D1: "Diode PIN 180V 1500mA 3-Pin QFN EP T/R", Case/Package=QFN, Manufacturer="Skyworks Solutions", Max Current Rating=1.5A, Max Power Dissipation=2W, Category=Diodes, ComponentLink1Description=http://www.mouser.com/ds/2/472/CLA4611_085LF_203346B-1079479.pdf?src-supplier=Mouser, ComponentLink1URL=http://www.mouser.com/ds/2/472/CLA4611_085LF_203346B-1079479.pdf?src-supplier=Mouser, ComponentLink2Description=http://www.skyworksinc.com/uploads/documents/CLA4611_085LF_203346B.pdf?src-supplier=Digi-Key, ComponentLink2URL=http://www.skyworksinc.com/uploads/documents/CLA4611_085LF_203346B.pdf?src-supplier=Digi-Key, Diode Type="PIN - Single", Manufacturer Part Number=CLA4611-085LF, Packaging="Tape and Reel", Pricing 1="1=2,06000, 10=1,85200, 25=1,74760, 100=1,48890, 250=1,39800, 500=1,22326, 1000=1,01355 (USD)", RoHS=Yes, Stock 1=1259, Supplier 1=Digi-Key
D2: "DIODE RF PIN 45V 1.5A 3QFN", Case/Package=QFN, Forward Current=1.5A, Manufacturer="Skyworks Solutions", Max Operating Temperature=150°C, Max Power Dissipation=2W, Min Operating Temperature=-40°C, Package Quantity=3000, Power Dissipation=30W, Reverse Voltage (DC)=45V, Category=Diodes, ComponentLink1Description=https://datasheet.ciiva.com/15224/getdatasheetpartid-729048-15224693.pdf?src-supplier=Verical, ComponentLink1URL=https://datasheet.ciiva.com/15224/getdatasheetpartid-729048-15224693.pdf?src-supplier=Verical, Diode Type="PIN - Single", Element Configuration="Common Anode", Lead Free="Lead Free", Manufacturer Part Number=CLA4603-085LF, Max Current Rating=1.5A, Mount="Surface Mount", Number of Pins=3, Packaging="Tape and Reel", Pricing 1="1=2,06000, 10=1,85200, 25=1,74760, 100=1,48890, 250=1,39800, 500=1,22326, 1000=1,01355 (USD)", Radiation Hardening=No, RoHS=Yes, Stock 1=32861, Supplier 1=Digi-Key, Termination=SMD/SMT
D7: Supplier Part Number 1=1465-1738-1-ND, Part Number=MADP-011029-14150T, Supplier 1=Digi-Key
D9 D10 D11 D12: "LED,  LTST-C190GKT", Case Code (Imperial)=0603, Case Code (Metric)=1608, Color=Green, Forward Current=30mA, Forward Voltage=2.1V, Lens Color=Colorless, Manufacturer 1="Vishay Lite-On", Max Operating Temperature=85°C, Min Operating Temperature=-55°C, Package Quantity=1, Power Dissipation=100mW, Reverse Voltage=5V, Supplier Part Number 1=160-1183-1-ND, Test Current=10mA, Voltage=2V, Case/Package=0603, ComponentLink1Description=https://datasheet.ciiva.com/11775/0900766b80dc02a6-11775616.pdf?src-supplier=RSComponents, ComponentLink1URL=https://datasheet.ciiva.com/11775/0900766b80dc02a6-11775616.pdf?src-supplier=RSComponents, ComponentLink2Description=https://datasheet.ciiva.com/2109/ltst-c190gkt-2109985.pdf?src-supplier=Digi-Key, ComponentLink2URL=https://datasheet.ciiva.com/2109/ltst-c190gkt-2109985.pdf?src-supplier=Digi-Key, ComponentLink3Description=https://datasheet.ciiva.com/16392/lite-on20ltst-c190gkt-16392818.pdf?src-supplier=Future+Electronics, ComponentLink3URL=https://datasheet.ciiva.com/16392/lite-on20ltst-c190gkt-16392818.pdf?src-supplier=Future+Electronics, ComponentLink4Description=https://datasheet.ciiva.com/12403/lite-on-ltst-c190gkt-187204-12403884.pdf?src-supplier=Mouser, ComponentLink4URL=https://datasheet.ciiva.com/12403/lite-on-ltst-c190gkt-187204-12403884.pdf?src-supplier=Mouser, ComponentLink5Description=https://datasheet.ciiva.com/2109/ltst-c190gkt-2109986.pdf?src-supplier=Digi-Key, ComponentLink5URL=https://datasheet.ciiva.com/2109/ltst-c190gkt-2109986.pdf?src-supplier=Digi-Key, ComponentLink6Description=https://datasheet.ciiva.com/2109/ltst-c190gkt-2109987.pdf?src-supplier=Digi-Key, ComponentLink6URL=https://datasheet.ciiva.com/2109/ltst-c190gkt-2109987.pdf?src-supplier=Digi-Key, Depth=0.8mm, Dominant Wavelength=569nm, Height=0.8mm, Illumination Color=Green, Lead Free="Lead Free", Length=1.6mm, Lens Style=Clear,Diffused,Colorless,Rectangular, Lens Transparency=Clear, Luminous Intensity=6mcd, Manufacturer Part Number 1=LTST-C190GKT, Mount="Surface Mount", Number of Elements=1, Number of LEDs=1, Number of Pins=2, Packaging="Tape and Reel", Power Rating=100mW, Pricing 1="1=0.26000, 10=0.18800, 100=0.08880, 500=0.05922, 1000=0.04639 (USD)", Radiation Hardening=No, RoHS=Yes, Stock 1=908158, Supplier 1=Digi-Key, Viewing Angle=130°, Wavelength=565nm, Width=0.8mm
FB1 FB15 FB30 FB31 FB32 FB33 FB34: library part Ferrite, Case Code (Imperial)=0603, Case Code (Metric)=1608, Current Rating=2A, DC Resistance (DCR)=45mR, Manufacturer 1=TDK, Manufacturer Part Number 1=MPZ1608S121ATAH0, Package Quantity=4000, Supplier Part Number 1=445-5219-1-ND, Tolerance=25%, Case/Package=0603, ComponentLink1Description=https://datasheet.ciiva.com/46634/beads-commercial-power-mpz-en-46634726.pdf?src-supplier=Digi-Key, ComponentLink1URL=https://datasheet.ciiva.com/46634/beads-commercial-power-mpz-en-46634726.pdf?src-supplier=Digi-Key, ComponentLink2Description=https://datasheet.ciiva.com/46634/beads-commercial-power-mpz-en-46634728.pdf?src-supplier=Digi-Key, ComponentLink2URL=https://datasheet.ciiva.com/46634/beads-commercial-power-mpz-en-46634728.pdf?src-supplier=Digi-Key, ComponentLink3Description=https://datasheet.ciiva.com/48682/beads-commercial-power-mpz-en-48682494.pdf?src-supplier=Avnet, ComponentLink3URL=https://datasheet.ciiva.com/48682/beads-commercial-power-mpz-en-48682494.pdf?src-supplier=Avnet, Core Material=Ferrite, Depth=0.8mm, Height=0.03inch, Impedance=120R, Length=0.063inch, Max DC Current=2A, Mount="Surface Mount", Packaging="Tape and Reel", Pricing 1="1=0.10000, 10=0.07900, 25=0.07160, 50=0.06440, 100=0.04720, 250=0.03432, 500=0.03146, 1000=0.02717 (USD)", RoHS=Yes, Stock 1=68096, Supplier 1=Digi-Key, Width=0.031inch
FB6: library part Ferrite, "FERRITE BEAD 120 OHM 0402 1LN", Case Code (Imperial)=0402, Case Code (Metric)=1005, Current Rating=300mA, DC Resistance (DCR)=550mR, Frequency=100MHz, Manufacturer=Murata, Manufacturer Part Number=BLM15BB121SN1D, Max Operating Temperature=125°C, Min Operating Temperature=-55°C, Package Quantity=1, Resistor Type="Ferrite Bead", Supplier Part Number 1=490-1008-1-ND, Tolerance=25%, Case/Package=0402, Category=Inductors, ComponentLink1Description=https://datasheet.ciiva.com/1466/5145-1466832.pdf?src-supplier=Element14, ComponentLink1URL=https://datasheet.ciiva.com/1466/5145-1466832.pdf?src-supplier=Element14, ComponentLink2Description=https://datasheet.ciiva.com/41449/001172179-da-01-en-drossel-0402-120r-1-0x0-5mm-10000st-41449466.pdf?src-supplier=Conrad, ComponentLink2URL=https://datasheet.ciiva.com/41449/001172179-da-01-en-drossel-0402-120r-1-0x0-5mm-10000st-41449466.pdf?src-supplier=Conrad, ComponentLink3Description=https://datasheet.ciiva.com/1466/5145-1466833.pdf?src-supplier=Element14, ComponentLink3URL=https://datasheet.ciiva.com/1466/5145-1466833.pdf?src-supplier=Element14, ComponentLink4Description=https://datasheet.ciiva.com/3082/l0110s0100blm15b-3082680.pdf?src-supplier=Avnet, ComponentLink4URL=https://datasheet.ciiva.com/3082/l0110s0100blm15b-3082680.pdf?src-supplier=Avnet, ComponentLink5Description=https://datasheet.ciiva.com/16213/l0110s0100blm15b-16213674.pdf?src-supplier=Future+Electronics, ComponentLink5URL=https://datasheet.ciiva.com/16213/l0110s0100blm15b-16213674.pdf?src-supplier=Future+Electronics, ComponentLink6Description=https://datasheet.ciiva.com/1012/l0110s0100blm15b-1012029.pdf?src-supplier=Digi-Key, ComponentLink6URL=https://datasheet.ciiva.com/1012/l0110s0100blm15b-1012029.pdf?src-supplier=Digi-Key, ComponentLink7Description=https://datasheet.ciiva.com/1012/l0110s0100blm15b-1012030.pdf?src-supplier=Digi-Key, ComponentLink7URL=https://datasheet.ciiva.com/1012/l0110s0100blm15b-1012030.pdf?src-supplier=Digi-Key, ComponentLink8Description=https://datasheet.ciiva.com/1012/l0110s0100blm15b-1012031.pdf?src-supplier=Digi-Key, ComponentLink8URL=https://datasheet.ciiva.com/1012/l0110s0100blm15b-1012031.pdf?src-supplier=Digi-Key, Core Material=Ferrite, Depth=0.5mm, Height=0.5mm, Impedance=120R, Lead Free="Lead Free", Length=1mm, Material=Ferrite,Steel, Max Current Rating=300mA, Max DC Current=300mA, Number of Circuits=1, Number of Lines=1, Number of Pins=2, Packaging="Tape and Reel", Pricing 1="1=0,10000, 10=0,08300, 25=0,07440, 50=0,05440, 100=0,04700, 250=0,03712, 500=0,03136, 1000=0,02640, 5000=0,02351 (USD)", REACH SVHC="No SVHC", RoHS=Yes, Shielding=Unshielded, Stock 1=72662, Supplier 1=Digi-Key, Termination=SMD/SMT, Test Frequency=100MHz, Width=0.5mm
FB7: library part Ferrite, "MURATA - BLM31PG330SN1L - Koralik ferrytowy, 1206 [jedn. metryczne: 3216], 33 ohm, 6 A, EMIFIL BLM31P Series, 0.009 ohm", Case Code (Imperial)=1206, Case Code (Metric)=3216, Current Rating=6A, DC Resistance (DCR)=9mR, Manufacturer=Murata, Manufacturer Part Number=BLM31PG330SN1L, Max Operating Temperature=125°C, Min Operating Temperature=-55°C, Package Quantity=1, Supplier Part Number 1=490-5989-1-ND, Test Frequency=100MHz, Tolerance=25%, Case/Package=1206, Category="Ferrite Beads and Chips", ComponentLink1Description=https://datasheet.ciiva.com/11799/0900766b811b5866-11799415.pdf?src-supplier=RSComponents, ComponentLink1URL=https://datasheet.ciiva.com/11799/0900766b811b5866-11799415.pdf?src-supplier=RSComponents, ComponentLink2Description=https://datasheet.ciiva.com/41449/001172384-da-01-en-drossel-1206-33r0-3-2x1-60mm-3000st-41449553.pdf?src-supplier=Conrad, ComponentLink2URL=https://datasheet.ciiva.com/41449/001172384-da-01-en-drossel-1206-33r0-3-2x1-60mm-3000st-41449553.pdf?src-supplier=Conrad, ComponentLink3Description=https://datasheet.ciiva.com/41449/001171745-da-01-en-chip-drossel1206-33r0-6000ma-3-2x1-60mm-41449400.pdf?src-supplier=Conrad, ComponentLink3URL=https://datasheet.ciiva.com/41449/001171745-da-01-en-chip-drossel1206-33r0-6000ma-3-2x1-60mm-41449400.pdf?src-supplier=Conrad, ComponentLink4Description=https://datasheet.ciiva.com/6211/l0110s0100blm31p-6211896.pdf?src-supplier=Digi-Key, ComponentLink4URL=https://datasheet.ciiva.com/6211/l0110s0100blm31p-6211896.pdf?src-supplier=Digi-Key, ComponentLink5Description=https://datasheet.ciiva.com/14122/apblm31p-data-e-14122216.pdf?src-supplier=Distrelec, ComponentLink5URL=https://datasheet.ciiva.com/14122/apblm31p-data-e-14122216.pdf?src-supplier=Distrelec, ComponentLink6Description=https://datasheet.ciiva.com/6211/l0110s0100blm31p-6211899.pdf?src-supplier=Digi-Key, ComponentLink6URL=https://datasheet.ciiva.com/6211/l0110s0100blm31p-6211899.pdf?src-supplier=Digi-Key, ComponentLink7Description=https://datasheet.ciiva.com/16205/l0110s0100blm31p-16205563.pdf?src-supplier=Future+Electronics, ComponentLink7URL=https://datasheet.ciiva.com/16205/l0110s0100blm31p-16205563.pdf?src-supplier=Future+Electronics, ComponentLink8Description=https://datasheet.ciiva.com/6211/l0110s0100blm31p-6211900.pdf?src-supplier=Digi-Key, ComponentLink8URL=https://datasheet.ciiva.com/6211/l0110s0100blm31p-6211900.pdf?src-supplier=Digi-Key, ComponentLink9Description=https://datasheet.ciiva.com/3067/c31e-3067133.pdf?src-supplier=Avnet, ComponentLink9URL=https://datasheet.ciiva.com/3067/c31e-3067133.pdf?src-supplier=Avnet, ComponentLink10Description=https://datasheet.ciiva.com/3067/c31e-3067134.pdf?src-supplier=Avnet, ComponentLink10URL=https://datasheet.ciiva.com/3067/c31e-3067134.pdf?src-supplier=Avnet, ComponentLink11Description=https://datasheet.ciiva.com/16552/c31e-16552158.pdf?src-supplier=Avnet+Europe, ComponentLink11URL=https://datasheet.ciiva.com/16552/c31e-16552158.pdf?src-supplier=Avnet+Europe, Contact Plating=Tin,Matte, Depth=1.6mm, Height=1.1mm, Impedance=33R, Lead Free="Lead Free", Length=3.2mm, Material=Steel,Ferrite, Max Current Rating=6A, Max DC Current=6A, Number of Lines=1, Number of Pins=2, Packaging="Tape and Reel", Pricing 1="1=0,31000, 10=0,24100, 25=0,19920, 50=0,17180, 100=0,15470, 250=0,13064, 500=0,11688, 1000=0,09969 (USD)", RoHS=Yes, Shielding=Unshielded, Stock 1=56200, Supplier 1=Digi-Key, Termination=Flat, Width=1.6mm
FB8 FB9 FB10 FB11 FB12 FB13 FB14 FB16 FB17 FB18 FB19 FB20 FB21: library part Ferrite, Case Code (Imperial)=0603, Case Code (Metric)=1608, Current Rating=2.5A, DC Resistance (DCR)=50mR, Manufacturer 1=Samsung, Manufacturer Part Number 1=CIS10P221NC, Max Operating Temperature=125°C, Min Operating Temperature=-55°C, Package Quantity=1, Supplier Part Number 1=1276-6350-2-ND, Tolerance=25%, Case/Package=0603, ComponentLink1Description=https://datasheet.ciiva.com/29994/cis10p101ac-29994155.pdf?src-supplier=Avnet, ComponentLink1URL=https://datasheet.ciiva.com/29994/cis10p101ac-29994155.pdf?src-supplier=Avnet, ComponentLink2Description=https://datasheet.ciiva.com/16395/cic21-series-16395893.pdf?src-supplier=Future+Electronics, ComponentLink2URL=https://datasheet.ciiva.com/16395/cic21-series-16395893.pdf?src-supplier=Future+Electronics, Core Material=Ferrite, Depth=0.8mm, Height=0.037inch, Impedance=220R, Lead Free="Lead Free", Length=0.063inch, Max Current Rating=2.5A, Max DC Current=2.5A, Mount="Surface Mount", Number of Lines=1, Packaging="Cut Tape", Pricing 1="4000=0.00880, 8000=0.00660, 12000=0.00638, 28000=0.00616, 100000=0.00572 (USD)", Radiation Hardening=No, RoHS=Yes, Stock 1=336000, Supplier 1=Digi-Key, Width=0.031inch
FB24 FB26: library part "Ferrite Chip", "SMT Ferrite Chip", Supplier Part Number 1=490-1008-1-ND, Supplier 1=Digi-Key
FID1 FID2 FID3 FID4 FID5 FID6: library part Fid
FL1: "SAW filter 420MHz", BW=10MHz, Fc=420MHz, IL (max)=3.5dB, Impedance In, Out="50 Ohm", In Pow (max)="10 dBm"
H1 H2 H3 H4 H5: library part 36900000, "WE-SHC Shielding Cabinet, Clip, 6.5x0.8x1.27mm", Manufacturer="Wurth Elektronik", Operating Temperature="-40 to +125degC", Base Material=Steel, ComponentLink1Description=Manufacturer, ComponentLink1URL=http://www.we-online.de, ComponentLink2Description=Datasheet, ComponentLink2URL=https://www.we-online.com/catalog/datasheet/36900000.pdf, Height=1.27mm, Length=6.5mm, Manufacturer Part Number=36900000, Mounting Technology=SMT, Packaging="Tape and Reel", Plating=Tin, Published Date="April 2020", Type=Clip, Width=0.8mm
J1 J2 J3 J4 J5 J7 J8 J10 J12: "Ultra Miniature Coaxial Connector Jack, 60 V, 50 Ohm, -40 to 90 degC, RoHS, Tape and Reel", Maximum Frequency="6 GHz", Operating Temperature Range="- 40 C to + 90 C", Supplier Part Number 1=62X0488, Body Material="Liquid Crystal Polymer (LCP)", Brand="TE Connectivity / AMP", ComponentLink1Description="Manufacturer URL", ComponentLink1URL=http://www.te.com, ComponentLink2Description=Datasheet, ComponentLink2URL=http://www.te.com/commerce/DocumentDelivery/DDEController?Action=srchrtrv&DocNm=1909763&DocType=Customer+Drawing&DocLang=English, Contact Material="Copper Alloy", Contact Plating=Gold, DatasheetVersion="Rev. B2", Factory Pack Quantity=5000, Gender="Jack (Female)", Impedance="50 Ohms", Mounting Technology="Surface Mount", Orientation=Straight, PackageDescription="3-Pin Surface Mount Device, Body 2.6 x 2.6 mm", PackageReference=SMD, Packaging=Reel, Product=Connectors, Product Category="RF Connectors / Coaxial Connectors", RF Series=UMCC, RoHS=Details, Supplier 1=Newark, Supplier 2=Farnell, Supplier 3=Digi-Key, Supplier 4=Digi-Key, Supplier 5=Digi-Key, Supplier Part Number 2=2781689, Supplier Part Number 3=A118077TR-ND, Supplier Part Number 4=A118077CT-ND, Supplier Part Number 5=A118077DKR-ND
J6: "SMA Straight Jack, Up to 18 GHz, -55 to 155 degC", Manufacturer="Adam Equipment", Manufacturer Part Number=RF2-19A-T-00-50-G, Supplier Part Number 1=2057-RF2-19A-T-00-50-G-ND, Pricing 1="1=2,90000, 10=2,78800, 25=2,55520, 50=2,43920, 100=2,32300, 250=2,03264, 500=1,97456, 1000=1,68418, 2500=1,56802 (USD)", RoHS=No, Stock 1=329, Supplier 1=Digi-Key
L1: library part IND_WW, "Inductor Chip 43nH 5% 2-Pin 0402 Paper T/R", Manufacturer=Murata, Manufacturer Part Number=LQG15WZ43NJ02D, Supplier Part Number 1=490-LQG15WZ43NJ02DCT-ND, ComponentLink1Description=http://datasheet.octopart.com/LQG15WZ43NJ02D-Murata-datasheet-138753957.pdf?src-supplier=Ciiva+Crawler, ComponentLink1URL=http://datasheet.octopart.com/LQG15WZ43NJ02D-Murata-datasheet-138753957.pdf?src-supplier=Ciiva+Crawler, ComponentLink2Description=http://datasheet.octopart.com/LQG15WZ43NJ02D-Murata-datasheet-140712826.pdf?src-supplier=Ciiva+Crawler, ComponentLink2URL=http://datasheet.octopart.com/LQG15WZ43NJ02D-Murata-datasheet-140712826.pdf?src-supplier=Ciiva+Crawler, ComponentLink3Description=http://datasheet.octopart.com/LQG15WZ43NJ02D-Murata-datasheet-141286732.pdf?src-supplier=Ciiva+Crawler, ComponentLink3URL=http://datasheet.octopart.com/LQG15WZ43NJ02D-Murata-datasheet-141286732.pdf?src-supplier=Ciiva+Crawler, ComponentLink4Description=http://datasheet.octopart.com/LQG15WZ43NJ02D-Murata-datasheet-145449678.pdf?src-supplier=Geoflip, ComponentLink4URL=http://datasheet.octopart.com/LQG15WZ43NJ02D-Murata-datasheet-145449678.pdf?src-supplier=Geoflip, Pricing 1="1=0,13000, 10=0,11700, 25=0,10400, 50=0,08840, 100=0,07800, 250=0,07152, 500=0,06500, 1000=0,05460, 2500=0,04680 (USD)", Stock 1=10000, Supplier 1=Digi-Key
L6: library part 744761227A, "WE-KI SMT Wire Wound Ceramic Inductor, size 0603, 270nH, 0.17A", DC Resistance max.=1.8Ohm, Inductance=270nH, Inductance Tolerance=+/-5%, Manufacturer="Wurth Elektronik", Operating Temperature="-40 to +125degC", Rated Current=0.17A, Self Resonant Frequency=1000MHz, ComponentLink1Description=Manufacturer, ComponentLink1URL=http://www.we-online.de, ComponentLink2Description=Datasheet, ComponentLink2URL=https://www.we-online.com/catalog/datasheet/744761227A.pdf, Manufacturer Part Number=744761227A, Mounting Technology=SMT, Packaging="Tape and Reel", Published Date="April 2020", Q-Factor min.=30, Size=0603
P1: library part CMP-0001-00067-2, "Golden finger, PCIeMini, Dual, Staggered, Pitch 0.8mm, 52-Position", Package Reference=PCIeMini-GF-2D-800-1K-S52, Package Version="rev1.2, Oct-2007", ClassName="Edge Connector", Datasheet Version="Revision 1.2 Oct-2007", Mating Connector=Tyco-292443-1, Publisher=Altium